# EAGLE board OpenAT_Switch_Latch (EAGLE 9.7.0)
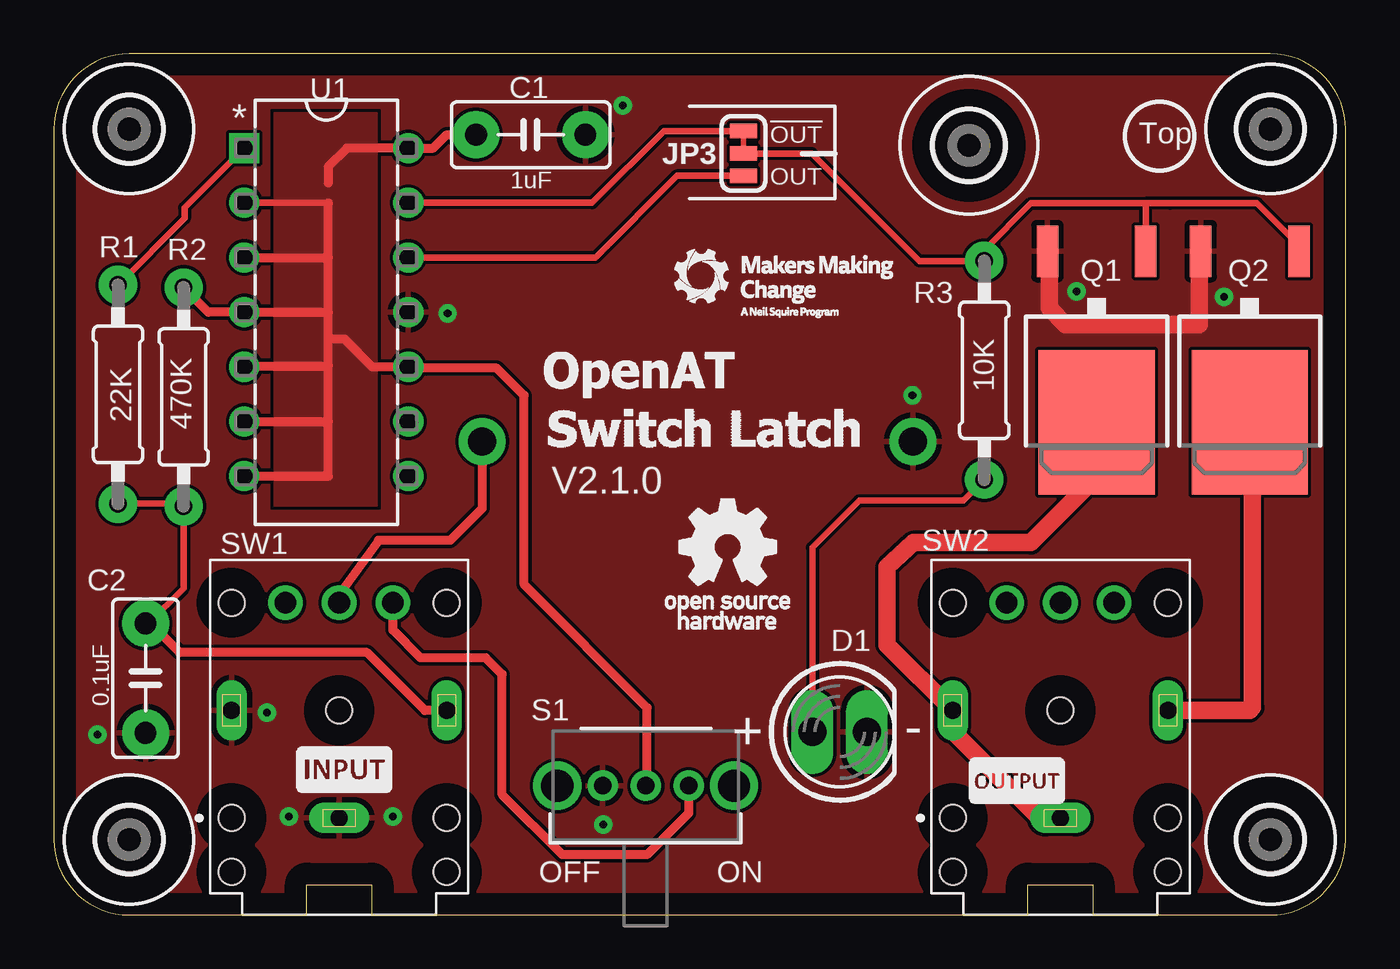
[diagram p0: board, top side]
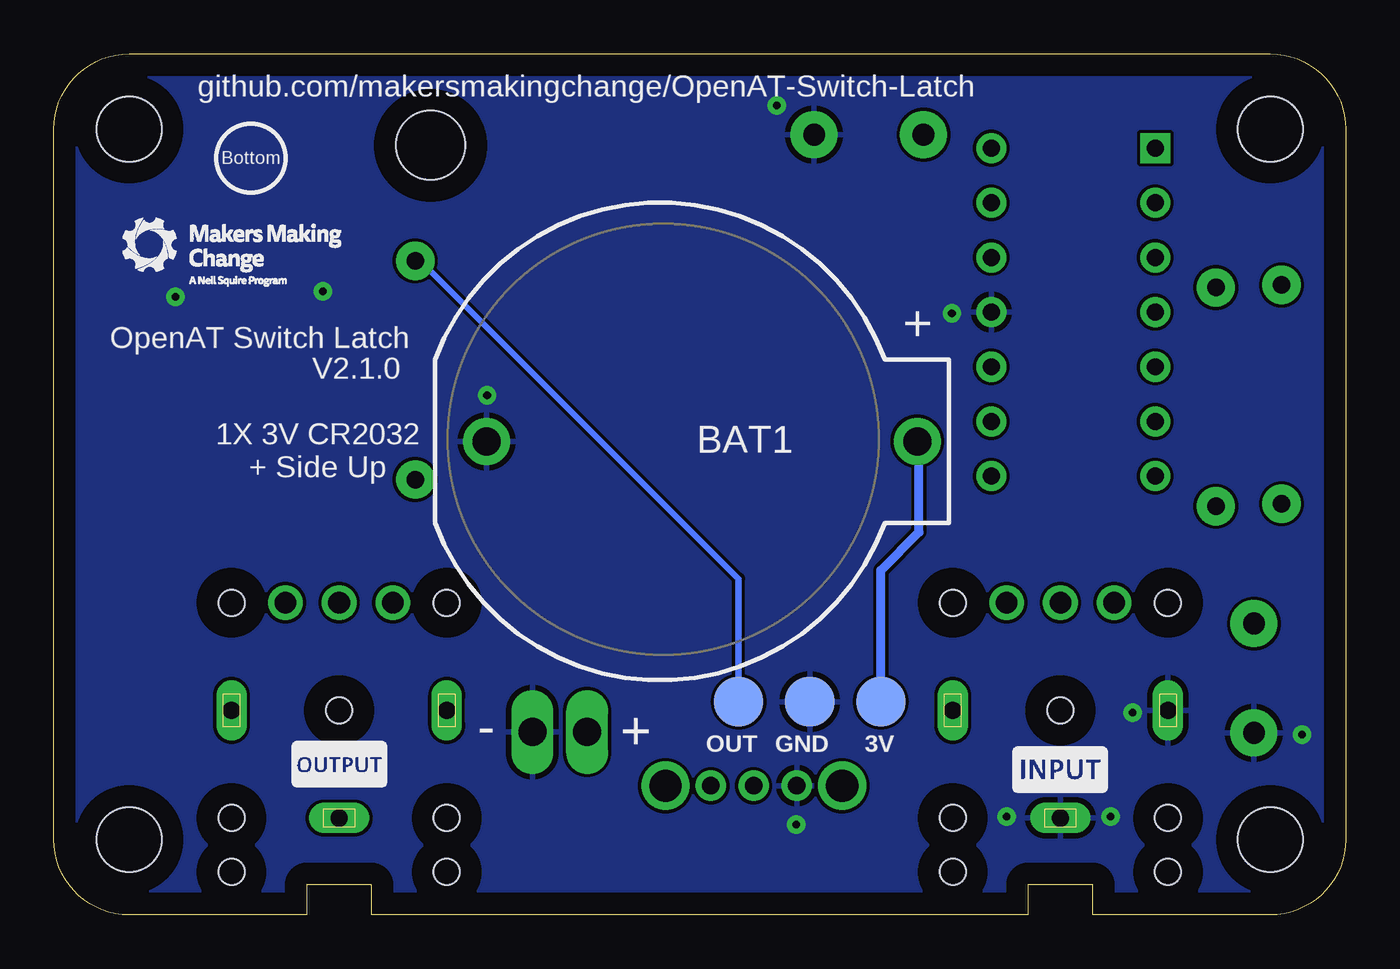
[diagram p1: board, bottom side, seen from below]

Size 60 x 40 mm. Coordinates in mm from the lower left corner, seen from the top.
Outline: 0,3.5 arc90 3.5,0 11.75,0 11.75,1.4 14.75,1.4 14.75,0 45.25,0 45.25,1.4 48.25,1.4 48.25,0 56.5,0 arc90 60,3.5 60,36.5 arc90 56.5,40 3.5,40 arc90 0,36.5 0,3.5
Copper layers (1*16): Top 0.035mm / dielectric 1.5mm / Bottom 0.035mm
Design rules "Fusion Electronics Design Rules": minimum track width 6mil, minimum drill 10mil, track to track 6mil, track to pad 10mil, pad to pad 6mil, via to via 6mil, smd to smd 6mil, copper to edge 40mil, drill to drill 10mil, minimum pad ring 12mil, minimum via ring 10mil, stop-mask expansion 4mil, vias tented up to drill 0mil, thermal gap 10mil

## Footprints (pad centres in the part's own frame; a part is rotated, then mirrored left to right if it is on the bottom)
SPRING_PIN_PAD_B2,30 = smd 2.3 x 2.3: TP 0,0
BATTCOM_20MM_PTH = drill 1.3 pad 2.184: + 11.85,0; - -8.15,0
CAP-050-030X075 = drill 1.016 pad 2.184: 1 -2.54,0; 2 2.54,0
LED_5MM_GREEN = drill 1.3 pad 1.676 long: A -1.27,0; K 1.27,0
HOLE-3MM = hole 3: 0,0
HOLE-3.2MM-CLEAR = hole 3.2: 0,0
JUMPERS_SMT-JUMPER_3_1-NC_TRACE_SILK = smd 0.66 x 1.27: 1 -1.041,0; 2 0,0; 3 1.041,0
TO-252_HAND = smd 1 x 2.4: 1 -2.28,-5.2; 3 2.28,-5.2 | smd 5.4 x 6.7: 2 0,2.75
RESISTOR_0207/10 = drill 0.813 pad 1.778: 1 -5.08,0; 2 5.08,0
SWITCH_SPDT_11MA1QS1 = drill 0.813 pad 1.321: 1 -2.007,0; 2 0,0; 3 1.981,0 | drill 1.499 pad 2.007: 4 -4.115,0; 5 4.089,0
CUI_SJ-3566AN = drill 0.8 long: 1 -5,0; 2 0,-5; 3 0,5 | drill 1: 4 5,2.5; 5 5,0; 6 5,-2.5 | hole 1.2: 5,5; 5,-5; 0,0; -5,5; -7.5,5; -5,-5; -7.5,-5
14-DIP = drill 0.787 pad 1.295 square: 1 -3.81,7.62 | drill 0.787 pad 1.295: 2 -3.81,5.08; 3 -3.81,2.54; 4 -3.81,0; 5 -3.81,-2.54; 6 -3.81,-5.08; 7 -3.81,-7.62; 8 3.81,-7.62; 9 3.81,-5.08; 10 3.81,-2.54; 11 3.81,0; 12 3.81,2.54; 13 3.81,5.08; 14 3.81,7.62

## Placement (x,y rotation side)
3V  TESTPAD_TPB1,27  [SPRING_PIN_PAD_B2,30]  21.59,9.91 180 bottom
BAT1  BAT1  [BATTCOM_20MM_PTH]  31.75,22 0 bottom
C1  1uF  [CAP-050-030X075]  22.15,36.24 180 top
C2  0.1uF  [CAP-050-030X075]  4.26,10.99 90 top
D1  [LED_5MM_GREEN]  36.5,8.5 0 top
GND  TESTPAD_TPB1,27  [SPRING_PIN_PAD_B2,30]  24.89,9.91 180 bottom
H1  MOUNT-HOLE-3MM  [HOLE-3MM]  3.5,3.5 0 top
H2  MOUNT-HOLE-3MM  [HOLE-3MM]  3.5,36.5 0 top
H3  MOUNT-HOLE-3MM  [HOLE-3MM]  56.5,36.5 0 top
H4  MOUNT-HOLE-3MM  [HOLE-3MM]  56.5,3.5 0 top
H5  MOUNT-HOLE-3.2MM-CLEAR  [HOLE-3.2MM-CLEAR]  42.5,35.75 0 top
JP3  JUMPERS-SMT_3_1-NC_TRACE_SILK  [JUMPERS_SMT-JUMPER_3_1-NC_TRACE_SILK]  32.03,35.37 270 top
LABEL_INPUT  MMC_LABEL-SW-INPUT  [LABEL-INPUT]  13.25,6.75 0 bottom
LABEL_INPUT1  MMC_LABEL-SW-INPUT  [LABEL-INPUT]  13.5,6.75 0 top
LABEL_LOGO  MMC_LOGO-XSM  [MMC_X-SMALL_LOGO]  33.81,27.75 0 top
LABEL_OUTPUT  MMC_LABEL-SW-OUTPUT  [LABEL-OUTPUT]  46.75,7 0 bottom
LABEL_OUTPUT_TOP  MMC_LABEL-SW-OUTPUT  [LABEL-OUTPUT]  44.72,6.24 0 top
LABEL_PCB_VERSION  V2.1.0  [LABEL-VERSION]  23.11,19.56 0 top
LABEL_PCB_VERSION1  V2.1.0  [LABEL-VERSION]  0.76,-2.79 180 bottom
OUT  TESTPAD_TPB1,27  [SPRING_PIN_PAD_B2,30]  28.19,9.91 180 bottom
Q1  IPD135N03LGT0252_HAND  [TO-252_HAND]  48.43,25.63 180 top
Q2  IPD135N03LGT0252_HAND  [TO-252_HAND]  55.54,25.63 180 top
R1  22K  [RESISTOR_0207/10]  2.98,24.18 270 top
R2  470K  [RESISTOR_0207/10]  6.03,24.06 90 top
R3  10K  [RESISTOR_0207/10]  43.21,25.3 90 top
S1  SWITCH-SPDT-OS102011  [SWITCH_SPDT_11MA1QS1]  27.5,6 0 top
SW1  SJ-3566AN  [CUI_SJ-3566AN]  13.25,9.5 90 top
SW2  SJ-3566AN  [CUI_SJ-3566AN]  46.75,9.5 90 top
U1  CD74HC73E  [14-DIP]  12.65,28 0 top
U$1  OSHW_LOGO-XSM  [OSHW_X-SMALL_LOGO]  31.24,16.26 0 top
U$2  MMC_LABEL-OPENAT  [LABEL-OPENAT]  27.18,25.15 0 top
U$3  MMC_LABEL-SWITCH-LATCH  [LABEL-SWITCH-LATCH]  30.23,22.35 0 top
U$4  CA######  [OSHWA-CERT-SMALL-SILK]  72.14,10.16 0 bottom  (outside the outline)
U$5  MMC_LOGO-XSM  [MMC_X-SMALL_LOGO]  51.82,29.21 0 bottom

## Library data of the parts
3V GND JP3 OUT = MMC_SMD_Library
BAT1 C1 C2 D1 H1-H5 LABEL_INPUT LABEL_INPUT1 LABEL_LOGO LABEL_OUTPUT LABEL_OUTPUT_TOP LABEL_PCB_VERSION LABEL_PCB_VERSION1 R1-R3 S1 U$1-U$5 = MMC_Electronics_Library
Q1 Q2 = MMC_Electronics_Library; MANUFACTURER: Infineon Technologies
SW1 SW2 = MMC_Electronics_Library; CUI_PURCHASE_URL: https://www.cuidevices.com/product/interconnect/connectors/audio-connectors/jacks/sj-356xn-series?utm_source=snapeda.com&utm_medium=referral&utm_campaign=snapedaBOM; DESCRIPTION: 3.5 mm, Stereo, Right Angle, Through Hole, SPDT Switch, Audio Jack Connector; DIGI-KEY_PART_NUMBER: CP-SJ-3566AN-ND; MF: CUI Devices; MP: SJ-3566AN; PACKAGE: None; PURCHASE-URL: https://pricing.snapeda.com/search/part/SJ-3566AN/?ref=eda
U1 = MMC_Electronics_Library; COPYRIGHT: Copyright (C) 2022 Ultra Librarian. All rights reserved.; DIGI-KEY_PART_NUMBER_1: 296-26013-5-ND; DIGI-KEY_PART_NUMBER_2: 2156-CD74HC73E-ND; MANUFACTURER_PART_NUMBER: CD74HC73E; MFR_NAME: Texas Instruments

## Nets
!OUT1: JP3.1 U1.13
!OUT2: U1.8
BAT_INPUT_SW: S1.3 SW1.6
BAT_POS: 3V.TP BAT1.+ SW1.5
CLK1: R1.1 U1.1
GND: BAT1.- C1.1 C2.1 D1.K GND.TP Q1.3 Q2.3 S1.1 SW1.1 SW1.3 U1.11
N$6: D1.A R3.1
OUT1: JP3.3 U1.12
OUT2: U1.9
OUT_SLEEVE: Q1.2 SW2.1 SW2.3
OUT_STATE: JP3.2 OUT.TP Q1.1 Q2.1 R3.2
OUT_TIP: Q2.2 SW2.2
SW_IN: C2.2 R1.2 R2.1 SW1.2
VCC: C1.2 R2.2 S1.2 U1.2 U1.3 U1.4 U1.5 U1.6 U1.7 U1.10 U1.14

## Tracks (layer width: path | path; a pad name or v marks a point on that pad's centre or on a via)
!OUT1
  Top 0.305: JP3.1 28.34,36.41 25,33.08 U1.13
BAT_INPUT_SW
  Top 0.406: S1.3 29.48,4.73 27.55,2.79 23.62,2.79 20.83,5.59 20.83,11.18 20.05,11.95 17.03,11.95 15.75,13.23 SW1.6
BAT_POS
  Top 0.406: BAT1.+ 19.9,18.88 18.41,17.4 15.08,17.4 13.25,14.88 SW1.5
  Bottom 0.406: 3V.TP 21.59,16 19.81,17.78 19.81,21.91 BAT1.+
CLK1
  Top 0.305: U1.1 6.07,32.85 6.07,32.35 R1.1
GND  (via drill 0.35)
  Top 0.813: Q1.3 46.23,30.74 46.23,28.19 46.99,27.43 53.21,27.43 53.21,30.78 Q2.3
  other vias: 18.29,27.94 39.88,24.13 15.75,4.57 10.92,4.57 9.91,9.4 2.03,8.38 26.42,37.59 47.5,28.96 54.36,28.7 25.53,4.19
  pour Bottom: 0,0 60,0 60,40 0,40
  pour Top (rank 3): 2.26,0.33 57.69,0.33 57.99,0.35 58.28,0.42 58.56,0.54 58.82,0.7 59.05,0.89 59.25,1.12 59.4,1.38 59.52,1.66 59.59,1.95 59.61,2.26 59.61,37.88 59.59,38.18 59.52,38.47 59.4,38.75 59.25,39.01 59.05,39.24 58.82,39.43 58.56,39.59 58.28,39.71 57.99,39.78 57.69,39.8 0.51,39.8 0.46,39.8 0.42,39.78 0.38,39.75 0.35,39.71 0.34,39.67 0.33,39.62 0.33,2.26 0.35,1.95 0.42,1.66 0.54,1.38 0.7,1.12 0.89,0.89 1.12,0.7 1.38,0.54 1.66,0.42 1.95,0.35
N$6
  Top 0.305: D1.A 35.23,17.06 37.41,19.24 42.23,19.24 R3.1
OUT1
  Top 0.305: JP3.3 28.94,34.33 25.15,30.54 U1.12
OUT_SLEEVE
  Top 0.813: SW2.1 45.77,4.5 41.75,8.52 SW2.3 38.7,12.55 38.7,16.16 39.92,17.29 45.38,17.29 48.43,20.34 Q1.2
OUT_STATE
  Top 0.305: JP3.2 35.21,35.37 40.2,30.38 R3.2 43.21,30.89 45.38,33.06 48.04,33.06 50.71,33.06 | Q2.1 57.82,31.11 55.88,33.06 51.85,33.06 50.71,33.06 | Q1.1 50.71,33.06
  Bottom 0.305: OUT.TP 28.19,15.62 42.96,30.38 R3.2
OUT_TIP
  Top 0.305: 55.63,22.86 55.61,22.88 Q2.2 55.67,22.88
  Top 0.813: SW2.2 55.54,9.5 55.67,9.63 55.67,22.88
SW_IN
  Top 0.305: R1.2 5.91,19.1 R2.1 6.03,15.17 4.39,13.53 4.32,13.53 C2.2
  Top 0.406: SW1.2 17.23,9.5 14.54,12.19 5.84,12.19 4.5,13.53 4.32,13.53
VCC
  Top 0.305: U1.2 12.69,33.08 12.75,33.02
  Top 0.406: 12.75,22.92 12.75,20.38 U1.7 | 12.75,22.92 12.75,25.5 | 12.75,25.5 12.75,26.75 | 12.75,26.75 12.75,28 | 12.75,28 12.75,30.54 | 12.75,30.54 12.75,33.02 12.75,33.08 | 12.75,34 12.75,34.75 13.62,35.62 U1.14 17.62,35.62 18.24,36.24 C1.2 | U1.3 12.75,30.54 | 12.75,28 U1.4 7.17,28 R2.2 | U1.5 8.84,25.5 12.75,25.5 | U1.6 12.75,22.92 | 12.75,26.75 13.5,26.75 14.79,25.46 U1.10 16.52,25.4 20.57,25.4 21.84,24.13 21.84,15.34 27.56,9.63 27.56,6.06 S1.2
  pour Top (rank 2): 10.27,19.01 14.99,19.01 14.99,37.24 10.27,37.24
(copper drawn outside any net)
  shapes: Bottom area x3

## Text on the board
tPlace: !OUT | OUT | OFF | ON
bPlace: github.com/makersmakingchange/OpenAT-Switch-Latch | Bottom | OpenAT Switch Latch | 1X 3V CR2032 / + Side Up
tNames: Top
bNames: +